# Altium PCB iMX6 Rex_V1I1_PCB.PcbDoc (part 2 of 8)
Units mm, origin at the board's own origin, x right, y up, seen from the top; angles counter-clockwise.
Board outline 70 x 40 mm, 12 copper layers (L1, L2, L3, L4, L5 (PWR), L6 (PWR), L7 (PWR), L8 (PWR), L9, L10, L11, L12), stack 1.566 mm thick; 473 components, 409 nets, 2294 pads, 1880 vias.
Unrouted connection lines stored in the file: 7.
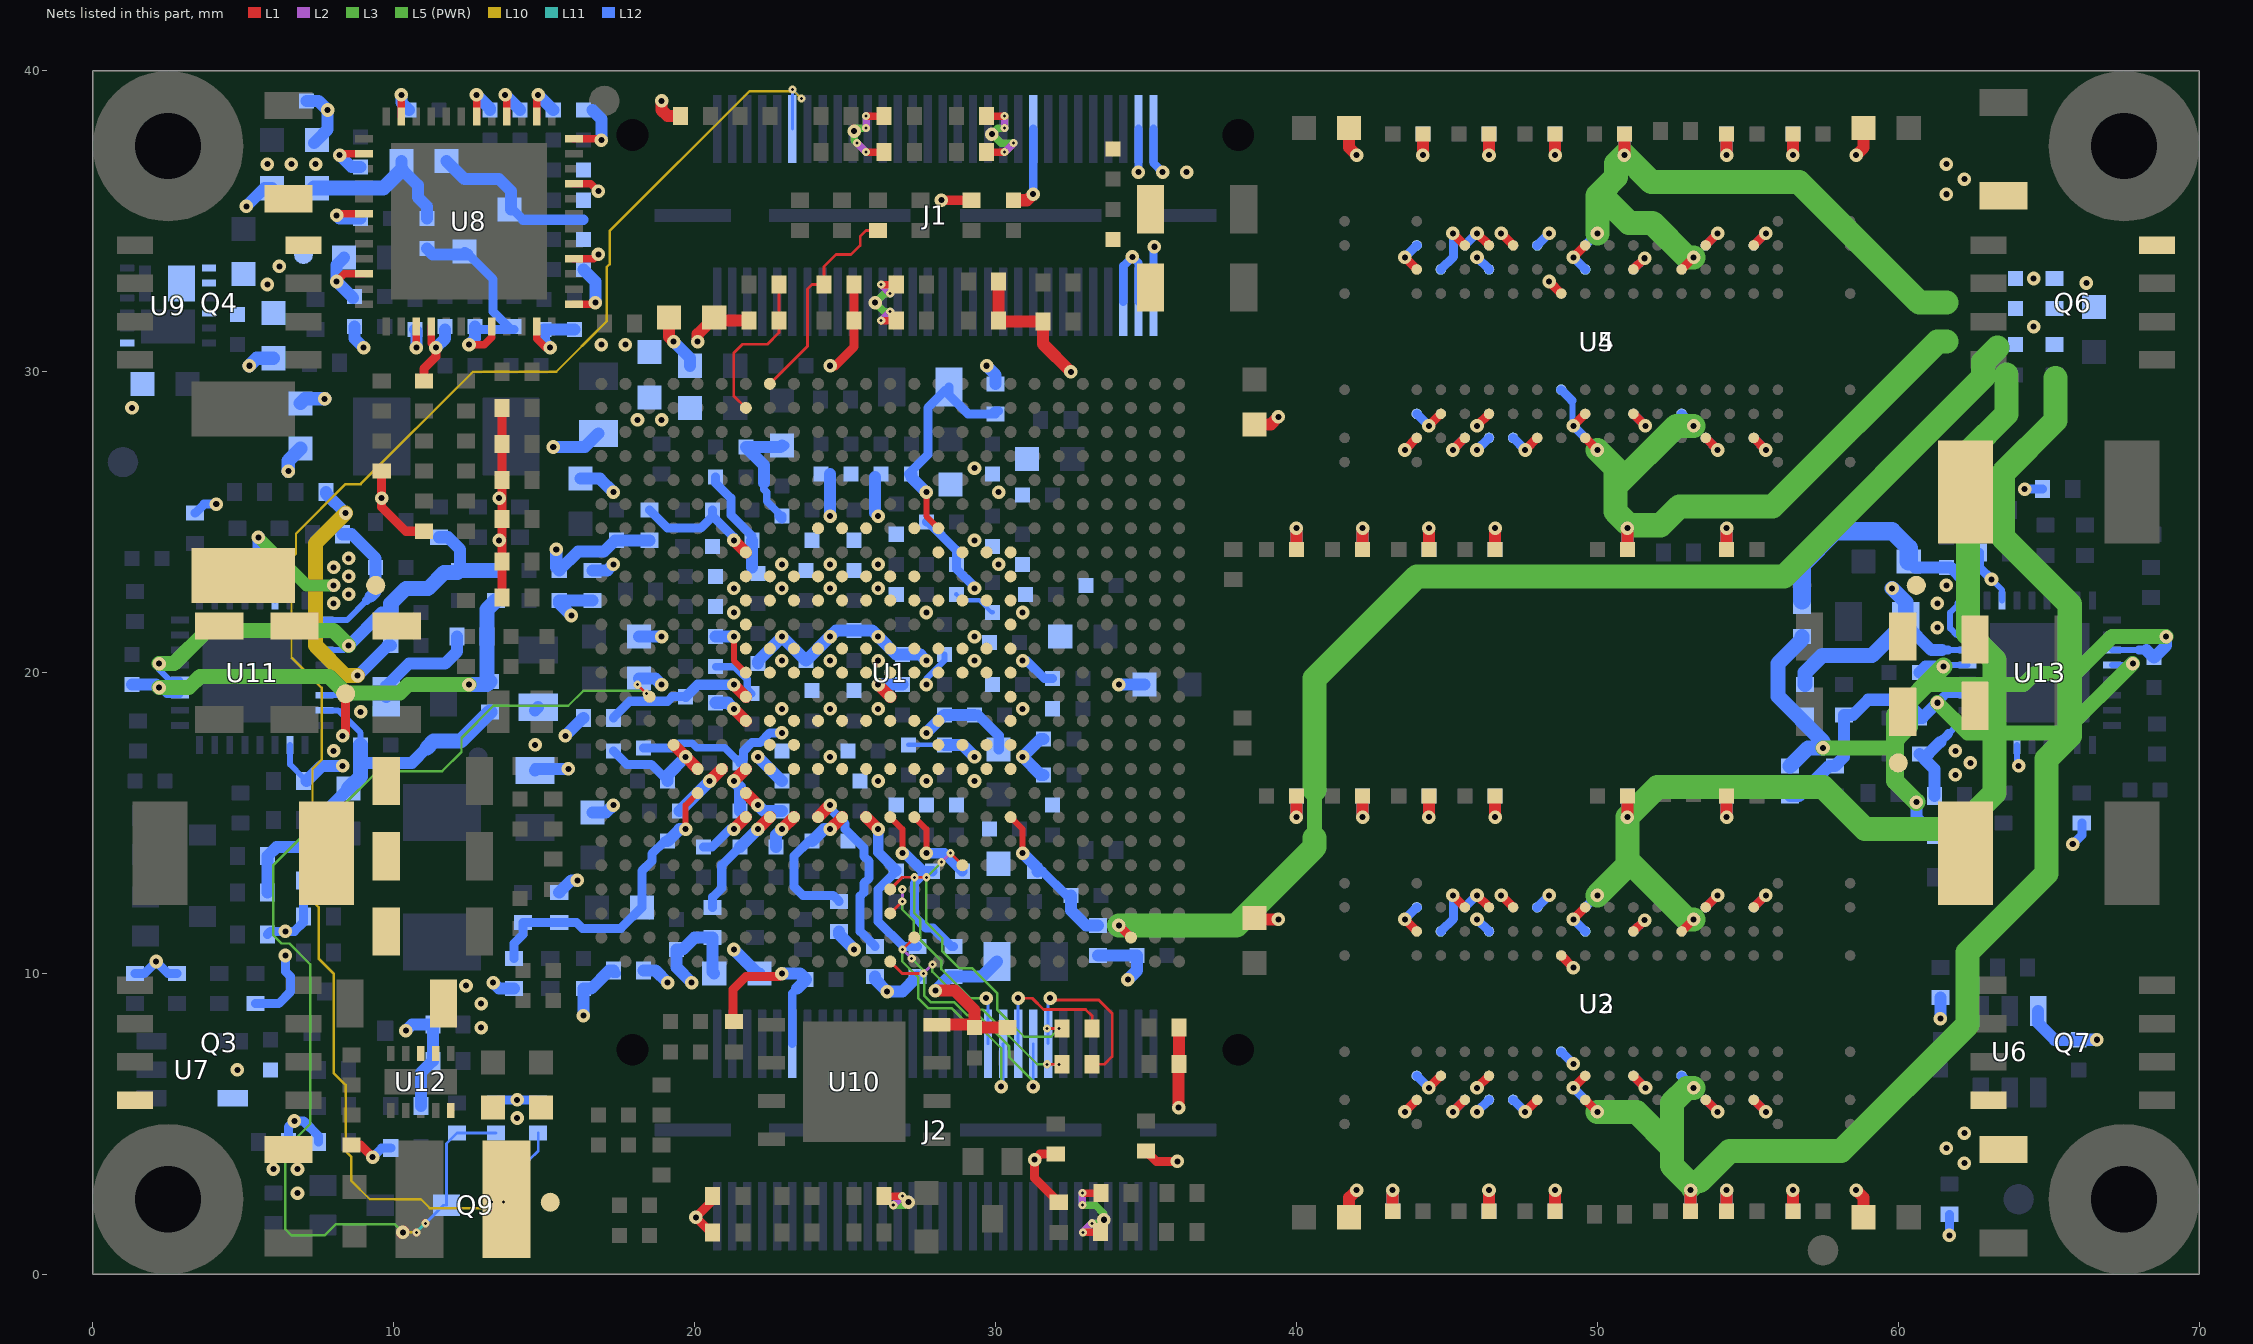
[diagram p12: the nets of this part, all layers, seen from the top]

## Footprints (in the part's own frame and the unit in brackets; to place one, negate y for a bottom-side part, rotate by r counter-clockwise, add the part's x,y. Pads: shape width x height; smd on the part's side, far side on the other; paste and mask are expansions set on the pad) (continued)
PBGA624 [mm] "Creator MM"
  round 0.4 smd mask+0.05: A2(-8.8,9.6) A3(-8,9.6) A4(-7.2,9.6) A5(-6.4,9.6) A6(-5.6,9.6) A7(-4.8,9.6) A8(-4,9.6) A9(-3.2,9.6) A10(-2.4,9.6) A11(-1.6,9.6) A12(-0.8,9.6) A13(0,9.6) A14(0.8,9.6) A15(1.6,9.6) A16(2.4,9.6) A17(3.2,9.6) A18(4,9.6) A19(4.8,9.6) A20(5.6,9.6) A21(6.4,9.6) A22(7.2,9.6) A23(8,9.6) A24(8.8,9.6) A25(9.6,9.6) AA1(-9.6,-6.4) AA2(-8.8,-6.4) AA3(-8,-6.4) AA4(-7.2,-6.4) AA5(-6.4,-6.4) AA6(-5.6,-6.4) AA7(-4.8,-6.4) AA8(-4,-6.4) AA9(-3.2,-6.4) AA10(-2.4,-6.4) AA11(-1.6,-6.4) AA12(-0.8,-6.4) AA13(0,-6.4) AA14(0.8,-6.4) AA15(1.6,-6.4) AA16(2.4,-6.4) AA17(3.2,-6.4) AA18(4,-6.4) AA19(4.8,-6.4) AA20(5.6,-6.4) AA21(6.4,-6.4) AA22(7.2,-6.4) AA23(8,-6.4) AA24(8.8,-6.4) AA25(9.6,-6.4) AB1(-9.6,-7.2) AB2(-8.8,-7.2) AB3(-8,-7.2) AB4(-7.2,-7.2) AB5(-6.4,-7.2) AB6(-5.6,-7.2) AB7(-4.8,-7.2) AB8(-4,-7.2) AB9(-3.2,-7.2) AB10(-2.4,-7.2) AB11(-1.6,-7.2) AB12(-0.8,-7.2) AB13(0,-7.2) AB14(0.8,-7.2) AB15(1.6,-7.2) AB16(2.4,-7.2) AB17(3.2,-7.2) AB18(4,-7.2) AB19(4.8,-7.2) AB20(5.6,-7.2) AB21(6.4,-7.2) AB22(7.2,-7.2) AB23(8,-7.2) AB24(8.8,-7.2) AB25(9.6,-7.2) AC1(-9.6,-8) AC2(-8.8,-8) AC3(-8,-8) AC4(-7.2,-8) AC5(-6.4,-8) AC6(-5.6,-8) AC7(-4.8,-8) AC8(-4,-8) AC9(-3.2,-8) AC10(-2.4,-8) AC11(-1.6,-8) AC12(-0.8,-8) AC13(0,-8) AC14(0.8,-8) AC15(1.6,-8) AC16(2.4,-8) AC17(3.2,-8) AC18(4,-8) AC19(4.8,-8) AC20(5.6,-8) AC21(6.4,-8) AC22(7.2,-8) AC23(8,-8) AC24(8.8,-8) AC25(9.6,-8) AD1(-9.6,-8.8) AD2(-8.8,-8.8) AD3(-8,-8.8) AD4(-7.2,-8.8) AD5(-6.4,-8.8) AD6(-5.6,-8.8) AD7(-4.8,-8.8) AD8(-4,-8.8) AD9(-3.2,-8.8) AD10(-2.4,-8.8) AD11(-1.6,-8.8) AD12(-0.8,-8.8) AD13(0,-8.8) AD14(0.8,-8.8) AD15(1.6,-8.8) AD16(2.4,-8.8) AD17(3.2,-8.8) AD18(4,-8.8) AD19(4.8,-8.8) AD20(5.6,-8.8) AD21(6.4,-8.8) AD22(7.2,-8.8) AD23(8,-8.8) AD24(8.8,-8.8) AD25(9.6,-8.8) AE1(-9.6,-9.6) AE2(-8.8,-9.6) AE3(-8,-9.6) AE4(-7.2,-9.6) AE5(-6.4,-9.6) AE6(-5.6,-9.6) AE7(-4.8,-9.6) AE8(-4,-9.6) AE9(-3.2,-9.6) AE10(-2.4,-9.6) AE11(-1.6,-9.6) AE12(-0.8,-9.6) AE13(0,-9.6) AE14(0.8,-9.6) AE15(1.6,-9.6) AE16(2.4,-9.6) AE17(3.2,-9.6) AE18(4,-9.6) AE19(4.8,-9.6) AE20(5.6,-9.6) AE21(6.4,-9.6) AE22(7.2,-9.6) AE23(8,-9.6) AE24(8.8,-9.6) AE25(9.6,-9.6) B1(-9.6,8.8) B2(-8.8,8.8) B3(-8,8.8) B4(-7.2,8.8) B5(-6.4,8.8) B6(-5.6,8.8) B7(-4.8,8.8) B8(-4,8.8) B9(-3.2,8.8) B10(-2.4,8.8) B11(-1.6,8.8) B12(-0.8,8.8) B13(0,8.8) B14(0.8,8.8) B15(1.6,8.8) B16(2.4,8.8) B17(3.2,8.8) B18(4,8.8) B19(4.8,8.8) B20(5.6,8.8) B21(6.4,8.8) B22(7.2,8.8) B23(8,8.8) B24(8.8,8.8) B25(9.6,8.8) C1(-9.6,8) C2(-8.8,8) C3(-8,8) C4(-7.2,8) C5(-6.4,8) C6(-5.6,8) C7(-4.8,8) C8(-4,8) C9(-3.2,8) C10(-2.4,8) C11(-1.6,8) C12(-0.8,8) C13(0,8) C14(0.8,8) C15(1.6,8) C16(2.4,8) C17(3.2,8) C18(4,8) C19(4.8,8) C20(5.6,8) C21(6.4,8) C22(7.2,8) C23(8,8) C24(8.8,8) C25(9.6,8) D1(-9.6,7.2) D2(-8.8,7.2) D3(-8,7.2) D4(-7.2,7.2) D5(-6.4,7.2) D6(-5.6,7.2) D7(-4.8,7.2) D8(-4,7.2) D9(-3.2,7.2) D10(-2.4,7.2) D11(-1.6,7.2) D12(-0.8,7.2) D13(0,7.2) D14(0.8,7.2) D15(1.6,7.2) D16(2.4,7.2) D17(3.2,7.2) D18(4,7.2) D19(4.8,7.2) D20(5.6,7.2) D21(6.4,7.2) D22(7.2,7.2) D23(8,7.2) D24(8.8,7.2) D25(9.6,7.2) E1(-9.6,6.4) E2(-8.8,6.4) E3(-8,6.4) E4(-7.2,6.4) E5(-6.4,6.4) E6(-5.6,6.4) E7(-4.8,6.4) E8(-4,6.4) E9(-3.2,6.4) E10(-2.4,6.4) E11(-1.6,6.4) E12(-0.8,6.4) E13(0,6.4) E14(0.8,6.4) E15(1.6,6.4) E16(2.4,6.4) E17(3.2,6.4) E18(4,6.4) E19(4.8,6.4) E20(5.6,6.4) E21(6.4,6.4) E22(7.2,6.4) E23(8,6.4) E24(8.8,6.4) E25(9.6,6.4) F1(-9.6,5.6) F2(-8.8,5.6) F3(-8,5.6) F4(-7.2,5.6) F5(-6.4,5.6) F6(-5.6,5.6) F7(-4.8,5.6) F8(-4,5.6) F9(-3.2,5.6) F10(-2.4,5.6) F11(-1.6,5.6) F12(-0.8,5.6) F13(0,5.6) F14(0.8,5.6) F15(1.6,5.6) F16(2.4,5.6) F17(3.2,5.6) F18(4,5.6) F19(4.8,5.6) F20(5.6,5.6) F21(6.4,5.6) F22(7.2,5.6) F23(8,5.6) F24(8.8,5.6) F25(9.6,5.6) G1(-9.6,4.8) G2(-8.8,4.8) G3(-8,4.8) G4(-7.2,4.8) G5(-6.4,4.8) G6(-5.6,4.8) G7(-4.8,4.8) G8(-4,4.8) G9(-3.2,4.8) G10(-2.4,4.8) G11(-1.6,4.8) G12(-0.8,4.8) G13(0,4.8) G14(0.8,4.8) G15(1.6,4.8) G16(2.4,4.8) G17(3.2,4.8) G18(4,4.8) G19(4.8,4.8) G20(5.6,4.8) G21(6.4,4.8) G22(7.2,4.8) G23(8,4.8) G24(8.8,4.8) G25(9.6,4.8) H1(-9.6,4) H2(-8.8,4) H3(-8,4) H4(-7.2,4) H5(-6.4,4) H6(-5.6,4) H7(-4.8,4) H8(-4,4) H9(-3.2,4) H10(-2.4,4) H11(-1.6,4) H12(-0.8,4) H13(0,4) H14(0.8,4) H15(1.6,4) H16(2.4,4) H17(3.2,4) H18(4,4) H19(4.8,4) H20(5.6,4) H21(6.4,4) H22(7.2,4) H23(8,4) H24(8.8,4) H25(9.6,4) J1(-9.6,3.2) J2(-8.8,3.2) J3(-8,3.2) J4(-7.2,3.2) J5(-6.4,3.2) J6(-5.6,3.2) J7(-4.8,3.2) J8(-4,3.2) J9(-3.2,3.2) J10(-2.4,3.2) J11(-1.6,3.2) J12(-0.8,3.2) J13(0,3.2) J14(0.8,3.2) J15(1.6,3.2) J16(2.4,3.2) J17(3.2,3.2) J18(4,3.2) J19(4.8,3.2) J20(5.6,3.2) J21(6.4,3.2) J22(7.2,3.2) J23(8,3.2) J24(8.8,3.2) J25(9.6,3.2) K1(-9.6,2.4) K2(-8.8,2.4) K3(-8,2.4) K4(-7.2,2.4) K5(-6.4,2.4) K6(-5.6,2.4) K7(-4.8,2.4) K8(-4,2.4) K9(-3.2,2.4) K10(-2.4,2.4) K11(-1.6,2.4) K12(-0.8,2.4) K13(0,2.4) K14(0.8,2.4) K15(1.6,2.4) K16(2.4,2.4) K17(3.2,2.4) K18(4,2.4) K19(4.8,2.4) K20(5.6,2.4) K21(6.4,2.4) K22(7.2,2.4) K23(8,2.4) K24(8.8,2.4) K25(9.6,2.4) L1(-9.6,1.6) L2(-8.8,1.6) L3(-8,1.6) L4(-7.2,1.6) L5(-6.4,1.6) L6(-5.6,1.6) L7(-4.8,1.6) L8(-4,1.6) L9(-3.2,1.6) L10(-2.4,1.6) L11(-1.6,1.6) L12(-0.8,1.6) L13(0,1.6) L14(0.8,1.6) L15(1.6,1.6) L16(2.4,1.6) L17(3.2,1.6) L18(4,1.6) L19(4.8,1.6) L20(5.6,1.6) L21(6.4,1.6) L22(7.2,1.6) L23(8,1.6) L24(8.8,1.6) L25(9.6,1.6) M1(-9.6,0.8) M2(-8.8,0.8) M3(-8,0.8) M4(-7.2,0.8) M5(-6.4,0.8) M6(-5.6,0.8) M7(-4.8,0.8) M8(-4,0.8) M9(-3.2,0.8) M10(-2.4,0.8) M11(-1.6,0.8) M12(-0.8,0.8) M13(0,0.8) M14(0.8,0.8) M15(1.6,0.8) M16(2.4,0.8) M17(3.2,0.8) M18(4,0.8) M19(4.8,0.8) M20(5.6,0.8) M21(6.4,0.8) M22(7.2,0.8) M23(8,0.8) M24(8.8,0.8) M25(9.6,0.8) N1(-9.6,0) N2(-8.8,0) N3(-8,0) N4(-7.2,0) N5(-6.4,0) N6(-5.6,0) N7(-4.8,0) N8(-4,0) N9(-3.2,0) N10(-2.4,0) N11(-1.6,0) N12(-0.8,0) N13(0,0) N14(0.8,0) N15(1.6,0) N16(2.4,0) N17(3.2,0) N18(4,0) N19(4.8,0) N20(5.6,0) N21(6.4,0) N22(7.2,0) N23(8,0) N24(8.8,0) N25(9.6,0) P1(-9.6,-0.8) P2(-8.8,-0.8) P3(-8,-0.8) P4(-7.2,-0.8) P5(-6.4,-0.8) P6(-5.6,-0.8) P7(-4.8,-0.8) P8(-4,-0.8) P9(-3.2,-0.8) P10(-2.4,-0.8) P11(-1.6,-0.8) P12(-0.8,-0.8) P13(0,-0.8) P14(0.8,-0.8) P15(1.6,-0.8) P16(2.4,-0.8) P17(3.2,-0.8) P18(4,-0.8) P19(4.8,-0.8) P20(5.6,-0.8) P21(6.4,-0.8) P22(7.2,-0.8) P23(8,-0.8) P24(8.8,-0.8) P25(9.6,-0.8) R1(-9.6,-1.6) R2(-8.8,-1.6) R3(-8,-1.6) R4(-7.2,-1.6) R5(-6.4,-1.6) R6(-5.6,-1.6) R7(-4.8,-1.6) R8(-4,-1.6) R9(-3.2,-1.6) R10(-2.4,-1.6) R11(-1.6,-1.6) R12(-0.8,-1.6) R13(0,-1.6) R14(0.8,-1.6) R15(1.6,-1.6) R16(2.4,-1.6) R17(3.2,-1.6) R18(4,-1.6) R19(4.8,-1.6) R20(5.6,-1.6) R21(6.4,-1.6) R22(7.2,-1.6) R23(8,-1.6) R24(8.8,-1.6) R25(9.6,-1.6) T1(-9.6,-2.4) T2(-8.8,-2.4) T3(-8,-2.4) T4(-7.2,-2.4) T5(-6.4,-2.4) T6(-5.6,-2.4) T7(-4.8,-2.4) T8(-4,-2.4) T9(-3.2,-2.4) T10(-2.4,-2.4) T11(-1.6,-2.4) T12(-0.8,-2.4) T13(0,-2.4) T14(0.8,-2.4) T15(1.6,-2.4) T16(2.4,-2.4) T17(3.2,-2.4) T18(4,-2.4) T19(4.8,-2.4) T20(5.6,-2.4) T21(6.4,-2.4) T22(7.2,-2.4) T23(8,-2.4) T24(8.8,-2.4) T25(9.6,-2.4) U1(-9.6,-3.2) U2(-8.8,-3.2) U3(-8,-3.2) U4(-7.2,-3.2) U5(-6.4,-3.2) U6(-5.6,-3.2) U7(-4.8,-3.2) U8(-4,-3.2) U9(-3.2,-3.2) U10(-2.4,-3.2) U11(-1.6,-3.2) U12(-0.8,-3.2) U13(0,-3.2) U14(0.8,-3.2) U15(1.6,-3.2) U16(2.4,-3.2) U17(3.2,-3.2) U18(4,-3.2) U19(4.8,-3.2) U20(5.6,-3.2) U21(6.4,-3.2) U22(7.2,-3.2) U23(8,-3.2) U24(8.8,-3.2) U25(9.6,-3.2) V1(-9.6,-4) V2(-8.8,-4) V3(-8,-4) V4(-7.2,-4) V5(-6.4,-4) V6(-5.6,-4) V7(-4.8,-4) V8(-4,-4) V9(-3.2,-4) V10(-2.4,-4) V11(-1.6,-4) V12(-0.8,-4) V13(0,-4) V14(0.8,-4) V15(1.6,-4) V16(2.4,-4) V17(3.2,-4) V18(4,-4) V19(4.8,-4) V20(5.6,-4) V21(6.4,-4) V22(7.2,-4) V23(8,-4) V24(8.8,-4) V25(9.6,-4) W1(-9.6,-4.8) W2(-8.8,-4.8) W3(-8,-4.8) W4(-7.2,-4.8) W5(-6.4,-4.8) W6(-5.6,-4.8) W7(-4.8,-4.8) W8(-4,-4.8) W9(-3.2,-4.8) W10(-2.4,-4.8) W11(-1.6,-4.8) W12(-0.8,-4.8) W13(0,-4.8) W14(0.8,-4.8) W15(1.6,-4.8) W16(2.4,-4.8) W17(3.2,-4.8) W18(4,-4.8) W19(4.8,-4.8) W20(5.6,-4.8) W21(6.4,-4.8) W22(7.2,-4.8) W23(8,-4.8) W24(8.8,-4.8) W25(9.6,-4.8) Y1(-9.6,-5.6) Y2(-8.8,-5.6) Y3(-8,-5.6) Y4(-7.2,-5.6) Y5(-6.4,-5.6) Y6(-5.6,-5.6) Y7(-4.8,-5.6) Y8(-4,-5.6) Y9(-3.2,-5.6) Y10(-2.4,-5.6) Y11(-1.6,-5.6) Y12(-0.8,-5.6) Y13(0,-5.6) Y14(0.8,-5.6) Y15(1.6,-5.6) Y16(2.4,-5.6) Y17(3.2,-5.6) Y18(4,-5.6) Y19(4.8,-5.6) Y20(5.6,-5.6) Y21(6.4,-5.6) Y22(7.2,-5.6) Y23(8,-5.6) Y24(8.8,-5.6) Y25(9.6,-5.6)
  silkscreen extent -10.6,-10.6 10.6,10.6, body extent -10.5,-10.5 10.5,10.5, height 1.1
QFN48_7MMX7MM [mm] "Creator MM"
  rect 0.6x0.25 smd mask+0.03: 1(-3.49,2.75) 2(-3.49,2.25) 3(-3.49,1.75) 4(-3.49,1.25) 5(-3.49,0.75) 6(-3.49,0.25) 7(-3.49,-0.25) 8(-3.49,-0.75) 9(-3.49,-1.25) 10(-3.49,-1.75) 11(-3.49,-2.25) 12(-3.49,-2.75) 25(3.49,-2.75) 26(3.49,-2.25) 27(3.49,-1.75) 28(3.49,-1.25) 29(3.49,-0.75) 30(3.49,-0.25) 31(3.49,0.25) 32(3.49,0.75) 33(3.49,1.25) 34(3.49,1.75) 35(3.49,2.25) 36(3.49,2.75)
  rect 0.25x0.6 smd mask+0.03: 13(-2.75,-3.49) 14(-2.25,-3.49) 15(-1.75,-3.49) 16(-1.25,-3.49) 17(-0.75,-3.49) 18(-0.25,-3.49) 19(0.25,-3.49) 20(0.75,-3.49) 21(1.25,-3.49) 22(1.75,-3.49) 23(2.25,-3.49) 24(2.75,-3.49) 37(2.75,3.49) 38(2.25,3.49) 39(1.75,3.49) 40(1.25,3.49) 41(0.75,3.49) 42(0.25,3.49) 43(-0.25,3.49) 44(-0.75,3.49) 45(-1.25,3.49) 46(-1.75,3.49) 47(-2.25,3.49) 48(-2.75,3.49)
  rect 5.2x5.2 smd paste-10 mask+0.025: 49(0,0)
  silkscreen extent -3.5,-3.5 3.5,3.5, body extent -3.51,-3.51 3.51,3.51, height 0.78
QSH-030-01-L-D-A [mm]
  rect 2.27x0.28 smd mask+0.051: 1(-2.87,7.25) 2(2.87,7.25) 3(-2.87,6.75) 4(2.87,6.75) 5(-2.87,6.25) 6(2.87,6.25) 7(-2.87,5.75) 8(2.87,5.75) 9(-2.87,5.25) 10(2.87,5.25) 11(-2.87,4.75) 12(2.87,4.75) 13(-2.87,4.25) 14(2.87,4.25) 15(-2.87,3.75) 16(2.87,3.75) 17(-2.87,3.25) 18(2.87,3.25) 19(-2.87,2.75) 20(2.87,2.75) 21(-2.87,2.25) 22(2.87,2.25) 23(-2.87,1.75) 24(2.87,1.75) 25(-2.87,1.25) 26(2.87,1.25) 27(-2.87,0.75) 28(2.87,0.75) 29(-2.87,0.25) 30(2.87,0.25) 31(-2.87,-0.25) 32(2.87,-0.25) 33(-2.87,-0.75) 34(2.87,-0.75) 35(-2.87,-1.25) 36(2.87,-1.25) 37(-2.87,-1.75) 38(2.87,-1.75) 39(-2.87,-2.25) 40(2.87,-2.25) 41(-2.87,-2.75) 42(2.87,-2.75) 43(-2.87,-3.25) 44(2.87,-3.25) 45(-2.87,-3.75) 46(2.87,-3.75) 47(-2.87,-4.25) 48(2.87,-4.25) 49(-2.87,-4.75) 50(2.87,-4.75) 51(-2.87,-5.25) 52(2.87,-5.25) 53(-2.87,-5.75) 54(2.87,-5.75) 55(-2.87,-6.25) 56(2.87,-6.25) 57(-2.87,-6.75) 58(2.87,-6.75) 59(-2.87,-7.25) 60(2.87,-7.25)
  rect 0.43x2.54 smd mask+0.076: 61(0,8.065) 64(0,-8.065)
  rect 0.43x4.7 smd mask+0.076: 62(0,3.175) 63(0,-3.175)
  round 0 hole 1.05 unplated: 65(2.67,10.065) 66(2.67,-10.065)
  silkscreen extent -3.68,-10.8 3.68,10.8, body extent -3.75,-10.64 3.75,10.64, height 3.42
R0402 [mm]
  rect 0.5x0.6 smd: 1(-0.5,0) 2(0.5,0)
  silkscreen extent -1,-0.6 1,0.6, body extent -0.5,-0.25 0.5,0.25, height 0.4
SC70_SOT323 [mm]
  rect 0.9x0.7 smd: 1(-0.95,0.65) 2(-0.95,-0.65) 3(0.95,0)
  silkscreen extent -0.7,-1.27 0.7,1.27, body extent -1.27,-1.27 1.27,1.27, height 1.1
SOD323 [mil]
  rect 22x27 smd mask+3: 1(-48,0) 2(48,0)
  silkscreen extent -75,-28 71,28, body extent -49,-25 49,25, height 39
TP_25C [mm]
  round 0.635 smd paste-0.635 mask+0.051: 1(0,0)
VLCF4020 [mm] "Creator MM"
  rect 1.6x3.9 smd paste-10: 1(-1.45,0)
  rect 1.6x3.9 smd paste-10 mask+0.1: 2(1.45,0)
  silkscreen extent -0.35,-2.1 0.35,2.1, body extent -2.15,-2 2.15,2, height 2.1
WSON8_6X5MM [mm] "Creator MM"
  rect 0.9x0.45 smd: 1(-2.75,1.905) 2(-2.75,0.635) 3(-2.75,-0.635) 4(-2.75,-1.905) 5(2.75,-1.905) 6(2.75,-0.635) 7(2.75,0.635) 8(2.75,1.905)
  rect 3.4x4 smd: 9(0,0)
  silkscreen extent -3.1,-2.6 3.1,2.8, body extent -3,-2.5 3,2.5, height 0.8

## Part data
C1 C206 C207 C225 C226: library part C1005X5R1C105K, "CAP CER 1.0UF 16V X5R 0402"
C2 C209 C210 C220 C228 C229 C241: library part GRM31CR6YA106KA12L, "CAP CER 10UF 35V X5R 1206"
C3 C4 C5 C6 C8 C9 C10 C11 C21 C22 C23 C24 C25 C26 C27 C28 C29 C30 C31 C32 C33 C34 C35 C36 C37 C38 C39 C40 C41 C42 C43 C44 C45 C46 C47 C48 C49 C50 C51 C52 C53 C54 C55 C56 C57 C58 C59 C60 C61 C62 C64 C68 C73 C75 C76 C77 C79 C81 C82 C90 C91 C92 C93 C94 C95 C97 C98 C99 C100 C102 C103 C104 C105 C107 C108 C109 C110 C112 C113 C114 C115 C116 C117 C119 C120 C121 C122 C123 C124 C125 C126 C130 C131 C132 C133 C134 C136 C138 C140 C142 C143 C144 C145 C146 C149 C150 C152 C153 C154 C155 C157 C158 C159 C160 C161 C162 C163 C164 C165 C166 C167 C168 C169 C170 C171 C174: library part C1005X5R1E224M, "CAP CER .22UF 25V X5R 20% 0402"
C7 C18 C20 C63 C65 C66 C67 C74 C87 C88 C89 C181 C187 C190 C192 C195 C203 C205 C211 C212 C219 C224 C230 C231 C238 C239 C240 C242: library part C1005X5R1H104K, "CAP CER .10UF 50V X5R 10% 0402"
C12 C13 C14 C15 C16 C17 C96 C101 C106 C111 C118 C127 C128 C129 C135 C151 C172 C173: library part GRM188R60G226MEA0L, "CAP CER 22UF 4V 20% X5R 0603"
C19 C80 C177 C178 C180 C186 C191 C194 C199 C204 C221 C222 C223: library part C1608X5R0J106M, "CAP CER 10UF 6.3V X5R 20% 0603"
C69 C70 C71 C72 C139: library part C1005X7R1H103K, "CAP CER 10000PF 50V 10% X7R 0402"
C78 C243 C244 C245 C246 C247: library part C1005X5R1A475M, "CAP CER 4.7UF 10V 20% X5R 0402"
C83 C84 C85 C86: library part C1005C0G1H180J, "CAP CER 18PF 50V C0G 5% 0402"
C137 C141 C147 C148 C156: library part C2012X5R1C226K, "CAP CER 22UF 16V 10% X5R 0805"
C175 C176: library part C1005C0G1H220J, "CAP CER 22PF 50V C0G 5% 0402"
C179: library part GRM1555C1H561JA01D, "CAP CER 560PF 50V C0G 0402"
C182 C183 C184 C185 C188 C189 C193 C196 C197 C198 C200 C201 C202 C218 C237 C248 C249: library part C1005X7R1C103K, "CAP CER 10000PF 16V X7R 10% 0402"
C208 C227: library part GRM21BR71H105KA12L, "CAP CER 1UF 50V X7R 0805"
C213 C214 C215 C216 C217 C232 C233 C234 C235 C236: library part C3216X5R1A107M, "CAP CER 100UF 10V X5R 20% 1206"
D1: "DIODE SCHTKY 30MA 30V SOD-323"
D2: library part "LG L29K-G2J1-24-Z", "LED SMARTLED GREEN 570NM 0603"
D3: library part "LO L29K-H2K1-24-Z", "LED SMARTLED ORANGE 606NM 0603"
FB1 FB2 FB8: library part BLM18SG221TN1D, "FERRITE CHIP 220 OHM 2500MA 0603"
FB3 FB4 FB6 FB7: "FERRITE CHIP 100 OHM BEAD 0603 3A"
FB5: "FERRITE CHIP 600 OHM 0402 420mA"
FID1 FID2 FID3 FID4: "Fiducial 40mil Diameter, 52mil Mask"
J1 J2: "CONN RCPT HI-SPD .5MM 60POS DL"
L1: library part IHLP2525CZER4R7M01, "INDUCTOR POWER 4.7UH 5.5A SMD"
L2 L4 L5: library part IHLP2525CZER3R3M01, "INDUCTOR POWER 3.3UH 6A SMD"
L3: "INDUCTOR POWER 10UH .85A SMD"
MH1 MH2 MH3 MH4: "Mounting Hole 5mm Diameter, 2.2mm Drill"
Q1 Q2 Q5 Q8 Q9: "MOSFET N-CH 60V 310MA SOT323"
Q3 Q4 Q6 Q7: "MOSFET DL N-CH 30V 6.8A 8-SOIC"
R1 R35 R36 R50 R52 R66 R72 R83 R85 R86 R90 R92 R112 R159 R160 R161: library part RC0402FR-0722RL, "RES 22.0 OHM 1/16W 1% 0402 SMD"
R2 R3 R15: library part CRCW0402200RFKED, "RES 200 OHM 1/16W 1% 0402 SMD"
R4 R5 R8 R9 R10 R11 R12: library part RMCF0402FT240R, "RES TF 240 OHM 1% 0.0625W 0402"
R6 R7 R33 R38 R39 R40 R41 R42 R43 R48 R49 R57 R58 R60 R62 R63 R64 R67 R68 R69 R75 R91 R94 R95 R96 R97 R98 R100 R103 R104 R109 R110 R115 R127 R129 R130 R131 R132 R133 R136 R151 R153 R154 R155 R158 R165: library part RC0402FR-0710KL, "RES 10.0K OHM 1/16W 1% 0402 SMD"
R13 R14 R18 R19 R23 R24 R25 R26 R27 R34 R51 R65 R70 R71 R74 R76 R78 R80 R88 R93 R105 R106 R107 R108 R116 R117 R128 R140 R141 R152 R156 R157 R163 R164: library part RC0402JR-070RL, "RES 0.0 OHM 1/16W 0402 SMD"
R16 R17: library part RC0402FR-0749R9L, "RES 49.9 OHM 1/16W 1% 0402 SMD"
R20: library part CRCW0402191RFKED, "RES 191 OHM 1/16W 1% 0402 SMD"
R21 R22: library part RC0402FR-0747KL, "RES 47.0K OHM 1/16W 1% 0402 SMD"
R28 R29 R31 R32 R44 R45 R46 R47 R55 R56 R59 R84 R87 R89 R120: library part RMCF0402FT4K99, "RES TF 4.99K OHM 1% 1/16W 0402"
R30: library part ERJ-2RKF1601X, "RES 1.6K OHM 1/10W 1% 0402 SMD"
R37: library part CRCW04022M20FKED, "RES 2.20M OHM 1/16W 1% 0402 SMD"
R53 R54: library part CRCW040210M0FKED, "RES 10.0M OHM 1/16W 1% 0402 SMD"
R61 R99 R101 R102 R162: library part RC0402FR-071KL, "RES 1.00K OHM 1/16W 1% 0402 SMD"
R73 R111 R137 R143 R144: library part RMCF0402FT100K, "RES 100K OHM 1/16W 1% 0402 SMD"
R77: library part CRCW04022R20FKED, "RES 2.20 OHM 1/16W 1% 0402 SMD"
R79 R118 R142: library part RC0402FR-0710RL, "RES 10.0 OHM 1/16W 1% 0402 SMD"
R81 R82 R113 R114: library part RC0402FR-07220RL, "RES 220 OHM 1/16W 1% 0402 SMD"
R119: library part RC0402FR-0714KL, "RES 14.0K OHM 1/16W 1% 0402 SMD"
R121 R122 R145 R146: library part RC0402FR-071RL, "RES 1.00 OHM 1/16W 1% 0402 SM"
R123: library part RC0402FR-0739KL, "RES 39.0K OHM 1/16W 1% 0402 SMD"
R124 R125 R148 R149: library part RC0402FR-07200KL, "RES 200K OHM 1/16W 1% 0402 SMD"
R126 R150: library part CRCW040210K5FKED, "RES 10.5K OHM 1/16W 1% 0402 SMD"
R134: library part RC0402FR-0712KL, "RES 12.0K OHM 1/16W 1% 0402 SMD"
R135: library part RC0402FR-073K3L, "RES 3.30K OHM 1/16W 1% 0402 SMD"
R138: library part CRCW0402330KFKED, "RES 330K OHM 1/16W 1% 0402 SMD"
R139: library part RC0402FR-07120KL, "RES 120K OHM 1/16W 1% 0402 SMD"
R147: library part RC0402FR-0727KL, "RES 27.0K OHM 1/16W 1% 0402 SMD"
TP3 TP5 TP6 TP7 TP8 TP9 TP10 TP11: "Test Point 25mil"
U1: "IC MCU 32BIT ARM QUAD 624FCBGA"
U2 U3 U4 U5: "IC DDR3 SDRAM 2GBIT 667MHZ 96BGA"
U6: library part TPS3808G09DBVR, "IC VOLT SUPERVISOR 0.9V SOT23-6"
U7: "IC GATE AND SGL 2INP SOT23-5"
U8: "IC TXRX 10/100/1000 SGL 48QFN"
U9: "IC PWM REG 600mA 1.2V 12-MLF"
U10: library part SST25VF016B-75-4I-QAF, "IC FLASH 16MBIT 75MHZ 8WSON"
U11 U13: "IC MAIN PWR CTRLR QUAD 32-QFN"
U12: "IC REG BUCK SYNC ADJ 0.5A 10WSON"
Y1: library part ABM7-24.000MHZ-D-2-Y-T, "CRYSTAL 24.0000MHZ 18PF SMD"
Y2: library part ABS06-32.768KHZ-9-1-T, "CRYSTAL 32.768 KHZ 9.0 PF SMD"
Y3: library part "ABM7-25.000MHZ-D-2-Y-T V1.1", "CRYSTAL 25.0000 MHZ 18PF SMD"

## Via types
v1: diameter 0.45, hole 0.2, L1 to L12, tented both sides, 761 vias
v2: diameter 0.27, hole 0.1, L1 to L2, 305 vias
v3: diameter 0.27, hole 0.1, L2 to L3, 290 vias
v4: diameter 0.45, hole 0.2, L3 to L10, 196 vias
v5: diameter 0.27, hole 0.1, L11 to L12, 185 vias
v6: diameter 0.27, hole 0.1, L10 to L11, 142 vias
v7: diameter 0.45, hole 0.2, L3 to L10, tented both sides, 1 vias

## Nets (pads, with @x,y where several pads share a name; then routed paths per layer and width w, separated by ;. In a path a pad name is that pad's centre, name@x,y a point inside that pad or via, vN(x,y) a via of type N, cw(c..) or ccw(c..) an arc to the next point about the centre after c; other vN are vias at no path point)
+1V1_NVCC_PLL_OUT: C150.1 C151.1 R77.2 R79.2 R105.1 U1.E8 | length 10.4
  L1 w0.2: v1(19.7,14.8) 19.7,15.6 U1.E8@20.1,16
  L12 w0.3: R77.2@14,10.5 14,11 14.3,11.3 R79.2@14.3,11.7 R105.1@15.5,11.7 16.072,11.7 16.272,11.5 17.55,11.5 C151.1@18.25,12.2 18.25,13.412 18.575,13.737 18.575,13.975 C150.1@19,14.4 ; C150.1@19.05,14.35 C150.1@19.1,14.4
  L12 w0.4: C150.1@19.1,14.4 19.5,14.8 v1(19.7,14.8)
+1V1_VDDSOC_CAP: C78.1 C112.1 C113.1 C114.1 C115.1 C116.1 C117.1 C118.1 C138.1 C246.1 FB1.1 R13.1 R18.1 R23.1 U1.N12 U1.R10 U1.T10 U1.T13 U1.T14 U1.U10 U1.U13 U1.U14 | length 11.6
  L1 w0.4: v1(26.1,19.6) U1.N12@26.5,19.2
  L12 w0.15: C116.1@27.1,17.6 C115.1@28.3,17.6 ; C113.1@28.7,22.6 28.9,22.4 29.466,22.4 29.866,22 C114.1@29.9,22
  L12 w0.4: v1(15.9,21.9) 15.5,22.3 C246.1@15.5,22.4 R18.1@16.6,22.4 ; v1(19.9,9.7) 19.4,10.2 C78.1@19.4,10.8 19.6,10.8 20,11.2 R13.1@20.6,11.2 20.6,10.05 FB1.1@20.65,10 ; R23.1@24.8,11.4 24.8,11.3 v1(25.3,10.8) ; v1(26.1,19.6) C138.1@26.9,19.6 ; C115.1@28.3,17.6 28.9,17.6 v1(29.3,17.2)
  other v1: 29.3,20.4 29.3,21.2
+1V2_ETH: C178.1 C179.1 FB3.1 FB4.1 FB5.1 FB8.1 R105.2 TP5.1 U9.7 U9.8 U9.10 U9.15 | length 6.2
  L12 w0.4: FB4.1@10.25,37 10.25,36.75 10.8,36.2 10.8,35.8 11.1,35.5 FB5.1@11.1,35.1 ; R105.2@15.5,12.7 15.9,13.1 v1(16.1,13.1)
  L12 w0.5: FB3.1@7.35,36.1 9.65,36.1 FB4.1@10.25,36.7
  other v1: 5.8,32.9 6.2,33.5
+1V2_ETH_AVDDL: C186.1 C187.1 C188.1 C189.1 FB4.2 U8.4 U8.9 | length 7.5
  L1 w0.25: U8.4@15.99,33.75 16.65,33.75 v1(16.8,33.9) ; U8.9@15.99,36.25 16.55,36.25 v1(16.8,36)
  L12 w0.3: C186.1@13.85,35.4 13.9,35.4 13.95,35.4 14.3,35.05
  L12 w0.35: 14.3,35.05 16.3,35.05
  L12 w0.4: FB4.2@11.75,37 12.35,36.4 13.5,36.4 13.9,36 C186.1@13.9,35.4
+1V2_ETH_AVDDL_PLL: C191.1 C192.1 C193.1 FB5.2 U8.44 | length 7.5
  L1 w0.25: v1(12.5,30.9) 13,30.9 13.25,31.15
  L12 w0.3: C191.1@12.35,34 12.372,34 13.3,33.072 13.3,32 C192.1@13.9,31.4 ; C193.1@12.7,31.4 C192.1@13.9,31.4 ; C192.1@14,31.4 C192.1@13.9,31.4
  L12 w0.4: FB5.2@11.1,34.1 11.3,33.9 C191.1@12.45,33.9 ; v1(12.5,30.9) 12.7,31.1 12.7,31.4 C193.1@12.7,31.5
+1V2_ETH_DVDDL: C180.1 C181.1 C182.1 C183.1 C184.1 C185.1 C248.1 C249.1 FB3.2 U8.14 U8.18 U8.23 U8.26 U8.30 U8.39 | length 11.8
  L1 w0.25: v1@8.1,35.1 8.25,35.25 U8.30@9.01,35.25 ; v1@8.2,37.25 8.7,37.25 ; U8.23@10.25,38.49 v1(10.25,39.2) ; v1(10.75,30.8) U8.39@10.75,31.51 ; U8.18@12.75,38.49 v1(12.75,39.2) ; U8.14@14.75,38.49 v1@14.75,39.15
  L12 w0.4: v1(5.1,35.5) 5.7,36.1 FB3.2@5.95,36.1 ; C181.1@7.1,39 7.5,39 v1(7.8,38.7) 7.8,38.05 C180.1@7.45,37.7 C180.1@7.35,37.6 ; v1(8.1,35.2) 8.2,35.1 C183.1@8.9,35.1 ; v1(8.2,37.2) 8.6,36.8 C184.1@8.9,36.8 ; v1(10.25,39.2) 10.25,38.95 C249.1@10.5,38.7 ; C182.1@10.7,31.4 10.75,31.35 v1(10.75,30.8) ; v1(12.75,39.2) 13.2,38.75 C248.1@13.2,38.7 ; v1(14.8,39.2) C185.1@15.3,38.7
+1V2_VDD_ARM_CAP: C97.1 C98.1 C99.1 C100.1 C101.1 C102.1 C103.1 C104.1 C105.1 C106.1 U1.H11 U1.H13 U1.J11 U1.J13 U1.K11 U1.K13 U1.L11 U1.L13 U1.M11 U1.M13 U1.N11 U1.N13 U1.P11 U1.P13 U1.R11 U1.R13 | length 7.2
  L12 w0.2: v1(27.7,19.6) 27.7,19.799 28.3,20.399 C97.1@28.3,20.6
  L12 w0.25: C98.1@20.7,20.2 21.336,20.2 21.75,19.786 21.75,19.45 C103.1@21.9,19.3
  L12 w0.35: C102.1@29.3,18.6 29.407,18.6 30.1,17.907 C106.1@30.1,17.45
  L12 w0.4: C101.1@18.15,19.8 18.7,19.8 v1(18.9,19.6) ; v1(27.7,18) C105.1@28.3,18.6 C102.1@29.3,18.6
  other v1: 22.9,18.8 24.5,18.8 26.1,18.8 22.9,20.4 24.5,20.4 26.1,20.4
+1V5_DDR: C12.1 C13.1 C14.1 C15.1 C16.1 C17.1 C18.1 C19.1 C21.1 C22.1 C23.1 C24.1 C25.1 C26.1 C27.1 C28.1 C29.1 C30.1 C31.1 C32.1 C33.1 C34.1 C35.1 C36.1 C37.1 C38.1 C39.1 C40.1 C41.1 C42.1 C43.1 C44.1 C45.1 C46.1 C47.1 C48.1 C49.1 C50.1 C51.1 C52.1 C53.1 C54.1 C55.1 C56.1 C57.1 C58.1 C59.1 C60.1 C157.1 C158.1 C159.1 C160.1 C161.1 C162.1 C167.1 C168.1 C169.1 C170.1 C171.1 C172.1 C173.1 C235.1 C236.1 L5.2 R11.2 R59.2 TP9.1 U1.R18 U1.T18 U1.U18 U1.V9 U1.V10 U1.V11 U1.V12 U1.V13 U1.V14 U1.V15 U1.V16 U1.V17 U1.V18 U2.A1 U2.A8 U2.B2 U2.C1 U2.C9 U2.D2 U2.D9 U2.E9 U2.F1 U2.G7 U2.H2 U2.H9 U2.K2 U2.K8 U2.N1 U2.N9 U2.R1 U2.R9 U3.A1 U3.A8 U3.B2 U3.C1 U3.C9 U3.D2 U3.D9 U3.E9 U3.F1 U3.G7 U3.H2 U3.H9 U3.K2 U3.K8 U3.N1 U3.N9 U3.R1 U3.R9 U4.A1 U4.A8 U4.B2 U4.C1 U4.C9 U4.D2 U4.D9 U4.E9 U4.F1 U4.G7 U4.H2 U4.H9 U4.K2 U4.K8 U4.N1 U4.N9 U4.R1 U4.R9 U5.A1 U5.A8 U5.B2 U5.C1 U5.C9 U5.D2 U5.D9 U5.E9 U5.F1 U5.G7 U5.H2 U5.H9 U5.K2 U5.K8 U5.N1 U5.N9 U5.R1 U5.R9 U13.30 | length 83
  L1 w0.3: v1(43.6,5.4) U2.A1@44,5.8 ; v1(43.6,11.8) U2.A8@44,11.4 ; v1(43.6,33.8) U4.A8@44,33.4 ; v1@43.625,27.425 U4.A1@44,27.8 ; v1(44.4,6.2) U2.B2@44.8,6.6 ; v1(44.4,28.2) U4.B2@44.8,28.6 ; v1(45.2,5.4) U2.C1@45.6,5.8 ; v1(45.2,12.6) U2.C9@45.6,12.2 ; v1(45.2,27.4) U4.C1@45.6,27.8 ; v1(45.2,34.6) U4.C9@45.6,34.2 ; v1(46,6.2) U2.D2@46.4,6.6 ; v1(46,12.6) U2.D9@46.4,12.2 ; v1(46,28.2) U4.D2@46.4,28.6 ; v1(46,34.6) U4.D9@46.4,34.2 ; v1(46.8,12.6) U2.E9@47.2,12.2 ; v1(46.8,34.6) U4.E9@47.2,34.2 ; v1(47.6,5.4) U2.F1@48,5.8 ; v1(47.6,27.4) U4.F1@48,27.8 ; v1(48.4,33) U4.G7@48.8,32.6 ; U2.G7@48.8,10.6 v1(49.2,10.2) ; v1(49.2,6.2) U2.H2@49.6,6.6 ; v1(49.2,11.8) U2.H9@49.6,12.2 ; v1(49.2,28.2) U4.H2@49.6,28.6 ; v1(49.2,33.8) U4.H9@49.6,34.2 ; U2.K2@51.2,6.6 v1(51.6,6.2) ; U2.K8@51.2,11.4 v1(51.573,11.773) ; U4.K2@51.2,28.6 v1(51.6,28.2) ; U4.K8@51.2,33.4 v1(51.573,33.773) ; U2.N1@53.6,5.8 v1(54,5.4) ; U2.N9@53.6,12.2 v1(54,12.6) ; U4.N1@53.6,27.8 v1(54,27.4) ; U4.N9@53.6,34.2 v1(54,34.6) ; U2.R1@55.2,5.8 v1(55.6,5.4) ; U2.R9@55.2,12.2 v1(55.6,12.6) ; U4.R1@55.2,27.8 v1(55.6,27.4) ; U4.R9@55.2,34.2 v1(55.6,34.6)
  L1 w0.4: C12.1@38.6,11.85 38.65,11.8 v1(39.4,11.8) ; C17.1@38.6,28.25 39.15,28.25 v1(39.4,28.5) ; v1(40,15.2) C26.1@40,15.9 ; C39.1@40,24.1 v1(40,24.8) ; C14.1@41.75,1.9 41.75,2.55 v1(42,2.8) ; C15.1@41.75,38.1 41.75,37.45 v1(42,37.2) ; v1(42.2,15.2) C24.1@42.2,15.9 ; C40.1@42.2,24.1 v1(42.2,24.8) ; C27.1@43.2,2.1 v1(43.2,2.8) ; v1(44.2,37.2) C36.1@44.2,37.9 ; v1(44.4,15.2) C25.1@44.4,15.9 ; C31.1@44.4,24.1 v1(44.4,24.8) ; C28.1@46.4,2.1 v1(46.4,2.8) ; v1(46.4,37.2) C37.1@46.4,37.9 ; v1(46.6,15.2) C23.1@46.6,15.9 ; C33.1@46.6,24.1 v1(46.6,24.8) ; C29.1@48.6,2.1 v1(48.6,2.8) ; v1(48.6,37.2) C34.1@48.6,37.9 ; C30.1@54.3,2.1 v1(54.3,2.8) ; v1(54.3,15.2) C22.1@54.3,15.9 ; C32.1@54.3,24.1 v1(54.3,24.8) ; v1(54.3,37.2) C38.1@54.3,37.9 ; C21.1@56.5,2.1 v1(56.5,2.8) ; v1(56.5,37.2) C35.1@56.5,37.9 ; v1(58.6,2.8) 58.85,2.55 C13.1@58.85,1.9 ; v1(58.6,37.2) 58.85,37.45 C16.1@58.85,38.1
  L12 w0.2: 49.15,29.05 49.175,29.025 49.175,28.225 v1(49.2,28.2) ; U13.30@63.95,17.6 63.95,16.95 v1(64,16.9)
  L12 w0.3: v1(30.9,20.4) 31.028,20.4 31.628,19.8 C170.1@31.9,19.8 ; v1(34.1,19.6) C172.1@34.95,19.6 ; v1(43.6,11.8) U3.A1@44,12.2 ; v1(43.6,33.8) U5.A1@44,34.2 ; U3.A8@44,6.6 v1(44.4,6.2) ; U5.A8@44,28.6 v1(44.4,28.2) ; U3.B2@44.8,11.4 45.225,11.825 v1@45.225,12.575 ; U5.B2@44.8,33.4 45.225,33.825 45.225,34.575 v1(45.2,34.6) ; v1(45.2,5.4) U3.C9@45.6,5.8 ; v1(45.2,27.4) U5.C9@45.6,27.8 ; U3.C1@45.6,12.2 v1(46,12.6) ; U5.C1@45.6,34.2 v1(46,34.6) ; v1(46,5.4) U3.D9@46.4,5.8 ; v1(46,11.8) U3.D2@46.4,11.4 ; v1(46,27.4) U5.D9@46.4,27.8 ; v1(46,33.8) U5.D2@46.4,33.4 ; U3.E9@47.2,5.8 v1(47.6,5.4) ; U5.E9@47.2,27.8 v1(47.6,27.4) ; U3.F1@48,12.2 v1(48.4,12.6) ; U5.F1@48,34.2 v1(48.4,34.6) ; U5.G7@48.8,29.4 49.15,29.05 ; U3.G7@48.8,7.4 v1(49.2,7) ; v1(49.2,6.2) U3.H9@49.6,5.8 ; v1(49.2,11.8) U3.H2@49.6,11.4 ; v1(49.2,28.2) U5.H9@49.6,27.8 ; v1(49.2,33.8) U5.H2@49.6,33.4 ; U3.K8@51.2,6.6 v1(51.6,6.2) ; U3.K2@51.2,11.4 v1(51.573,11.773) ; U5.K8@51.2,28.6 v1(51.6,28.2) ; U5.K2@51.2,33.4 v1(51.573,33.773) ; U3.N9@53.6,5.8 v1(54,5.4) ; U3.N1@53.6,12.2 v1(54,12.6) ; U5.N9@53.6,27.8 v1(54,27.4) ; U5.N1@53.6,34.2 v1(54,34.6) ; U3.R9@55.2,5.8 v1(55.6,5.4) ; U3.R1@55.2,12.2 v1(55.6,12.6) ; U5.R9@55.2,27.8 v1(55.6,27.4) ; U5.R1@55.2,34.2 v1(55.6,34.6)
  L12 w0.4: C158.1@31.6,16.6 31.5,16.6 v1(30.9,17.2) 31.5,17.8 C162.1@31.6,17.8 ; v1(34.1,19.6) C172.1@34.95,19.6 ; v1(40,15.2) C46.1@40,15.9 ; C60.1@40,24.1 v1(40,24.8) ; v1(42.2,15.2) C43.1@42.2,15.9 ; C51.1@42.2,24.1 v1(42.2,24.8) ; C47.1@43.2,2.1 v1(43.2,2.8) ; v1(44.2,37.2) C57.1@44.2,37.9 ; v1(44.4,15.2) C45.1@44.4,15.9 ; C53.1@44.4,24.1 v1(44.4,24.8) ; C49.1@46.4,2.1 v1(46.4,2.8) ; v1(46.4,37.2) C56.1@46.4,37.9 ; v1(46.6,15.2) C44.1@46.6,15.9 ; C52.1@46.6,24.1 v1(46.6,24.8) ; C48.1@48.6,2.1 v1(48.6,2.8) ; v1(48.6,37.2) C59.1@48.6,37.9 ; C50.1@54.3,2.1 v1(54.3,2.8) ; v1(54.3,15.2) C42.1@54.3,15.9 ; C54.1@54.3,24.1 v1(54.3,24.8) ; v1(54.3,37.2) C58.1@54.3,37.9 ; C41.1@56.5,2.1 v1(56.5,2.8) ; v1(56.5,37.2) C55.1@56.5,37.9 ; v1(61.4,8.5) R59.2@61.4,9.2
  other v1: 61.9,16.6 62.4,17 61.9,17.4 30.9,18.8 30.9,22 30.1,23.6 29.3,24.4 30.1,26 43.6,27.4 66.25,32.95 64.5,33.1
+1V375: C90.1 C91.1 C92.1 C93.1 C94.1 C95.1 C96.1 C107.1 C108.1 C109.1 C110.1 C111.1 C216.1 C217.1 C232.1 FB2.2 FB8.2 L2.2 R77.1 TP7.1 U1.H14 U1.J14 U1.K9 U1.K14 U1.L9 U1.L14 U1.M9 U1.M14 U1.N9 U1.N14 U1.P9 U1.P14 U1.R9 U1.R14 U1.T9 U1.U9 U11.30 | length 15.1
  L3 w0.4: v1(5.5,24.5) 7.1,22.9 v1(8,22.9)
  L12 w0.2: 5.9,23.1 6.05,22.95 U11.30@6.05,22.4
  L12 w0.3: 5.5,23.6 5.5,23.5 5.9,23.1
  L12 w0.4: 5.5,23.6 v1(5.5,24.5) ; v1(13.3,9.7) 13.5,9.5 R77.1@14,9.5 ; C111.1@18.15,21.2 v1(18.9,21.2) ; C92.1@22.1,20.3 22.1,20.376 22.9,21.176 v1(22.9,21.2) C93.1@23.7,20.4 v1(24.5,21.2) 24.7,21.4 C94.1@25.3,21.4 25.9,21.4 v1(26.1,21.2) 26.7,20.6 C95.1@26.9,20.6 27.5,20.6 v1(27.7,20.4)
  L12 w0.45: v1(5.2,30.2) 5.45,30.45 FB8.2@6,30.45
  other v1: 26.1,16.4 27.7,16.4 29.3,16.4 24.5,17.2 8,22.3 8.5,22.6 8.5,23.2 8,23.5 8.5,23.8 16.9,30.9 17.7,30.9
+1V375_VDDSOC_IN: C119.1 C120.1 C121.1 C122.1 C123.1 C124.1 C125.1 C126.1 C127.1 C128.1 C129.1 FB2.1 U1.H16 U1.J16 U1.K16 U1.L16 U1.M16 U1.N16 U1.P16 U1.R16 U1.T16 U1.U16 | length 7.7
  L12 w0.3: C125.1@20.7,26.5 20.7,26.3 21.2,25.8 21.2,25.246 21.9,24.546 C122.1@21.9,24.4 ; C119.1@27.7,25 27.772,25 28.7,24.072 C121.1@28.7,23.6 28.7,23.454 29.3,22.854 v1(29.3,22.8)
  L12 w0.4: C128.1@16.2,26.45 16.85,26.45 v1(17.3,26) ; C126.1@21.9,23.5 C122.1@21.9,24.4
  other v1: 27.7,22 22.9,22.8 24.5,22.8 26.1,22.8 29.3,26.8 18.1,28.4 18.9,28.4
+2V5: C153.1 C233.1 C234.1 C244.1 C245.1 C247.1 FB6.1 L4.1 R14.1 R19.1 R27.1 R34.1 R74.2 R78.2 R80.2 R147.2 TP8.1 U13.10 | length 14.9
  L12 w0.2: v1(63.1,23.1) 63.45,22.75 U13.10@63.45,22.4
  L12 w0.3: R14.1@17.3,10 R14.1@17.4,10 ; R147.2@62.7,24 62.7,23.5 v1(63.1,23.1)
  L12 w0.4: v1(15.4,24.1) 15.4,23.5 C247.1@15.5,23.4 16.121,24.021 16.979,24.021 17.358,24.4 C153.1@17.4,24.4 R80.2@18.5,24.4 ; v1(15.7,17.9) R19.1@16.3,18.5 ; v1(16.3,8.6) C244.1@16.3,9.5 16.558,9.5 17.158,10.1 R14.1@17.3,10.1 ; R78.2@26,9.9 26,9.8 v1(26.4,9.4) 26.9,9.4 R27.1@27.4,9.9 ; v1(29.7,30.2) 30,29.9 R74.2@30,29.6 ; R34.1@33.4,10.6 C245.1@34.7,10.6 34.7,10.1 v1(34.4,9.8)
  L12 w0.45: v1(6.5,26.7) 6.5,27.05 FB6.1@6.9,27.45
  other v1: 61.3,21.5 61.3,22.3 61.6,22.9
+2V5_ETH_DVDDH: C194.1 C195.1 C196.1 C197.1 C198.1 FB6.2 R75.2 R87.2 R89.2 R91.2 R94.2 R95.2 R96.2 R97.2 R98.2 R162.2 U8.16 U8.34 U8.40 | length 18.9
  L1 w0.25: v1(8.1,33) 8.35,33.25 U8.34@9.01,33.25 ; U8.40@11.25,31.51 11.25,30.95 v1(11.4,30.8) ; v1(13.7,39.2) 13.75,39.15 U8.16@13.75,38.49
  L1 w0.3: R87.2@9.6,26.7 v1(9.6,25.8) 9.6,25.5 10.4,24.7 R162.2@11,24.7 ; R89.2@11,29.7 11,30.1 11.4,30.5 v1(11.4,30.8) ; v1(13.5,24.4) 13.6,24.5 R96.2@13.6,25 ; R91.2@13.6,22.5 R97.2@13.6,23.7 v1@13.6,24.4 ; R96.2@13.6,25.1 R75.2@13.6,28.9
  L1 w0.4: v1(18.9,39) 18.9,38.7 19.1,38.5 R94.2@19.525,38.5
  L12 w0.4: C194.1@8.35,33.8 8.1,33.55 v1(8.1,33) C197.1@8.65,32.45 ; C195.1@8.7,31.5 8.7,31.1 v1(9,30.8) ; v1(11.4,30.8) 11.7,31.1 C198.1@11.7,31.4 ; v1(13.7,39.2) C196.1@14.2,38.7
  L12 w0.45: FB6.2@6.9,28.95 7.05,29.1 v1(7.7,29.1)
  other v1: 13.5,25.8
+2V5_VDDHIGH_VPH: C139.2 C140.1 C141.1 U1.H10 U1.J10 | length 6.7
  L12 w0.25: 19.328,17.5 19.478,17.65 19.922,17.65 20.072,17.5 21,17.5 C139.2@21.5,17
  L12 w0.3: C141.1@14.7,16.85 C141.1@14.75,16.8 ; C140.1@18.3,17.5 19.328,17.5 ; C139.2@21.5,17 21.625,17.125 21.625,17.397 21.903,17.675 22.175,17.675 22.5,18 v1(22.9,18)
  L12 w0.4: C141.1@14.7,16.75 14.75,16.8 v1(15.8,16.8)
+3V0_ALWAYS: C87.1 C136.1 C137.1 C142.1 C221.1 C222.1 L3.2 R48.2 R55.2 R60.2 R73.2 R103.2 R104.2 R106.2 R130.2 R138.2 R153.2 R154.2 R165.2 TP11.1 U1.G11 U1.H9 U1.J9 U6.6 U12.10 | length 16.6
  L1 w0.3: R138.2@8.6,4.3 8.9,4.3 v1(9.3,3.9)
  L1 w0.4: v1(21.3,18.8) U1.G11@21.7,18.4
  L1 w0.7: L3.2@13.75,2.5 L3.2@13.85,2.4
  L12 w0.3: R130.2@3.4,25.3 3.7,25.6 v1(4.1,25.6) ; R48.2@5.4,9 6.172,9 6.575,9.403 6.575,9.9 6.4,10.075 v1(6.4,10.6) ; R73.2@5.8,11.3 5.9,11.4 v1(6.4,11.4) 6.7,11.4 7,11.7 R103.2@7,11.9 R55.2@7,13.1 ; v1(9.3,3.9) 9.6,4.2 R106.2@9.9,4.2 ; R104.2@13.4,5.7 13.5,5.8 v1(14.1,5.8) 14.7,5.8 R165.2@14.8,5.7 ; v1(61.7,1.3) R60.2@61.7,2 ; v1(64.2,26.1) R153.2@64.8,26.1 ; v1(65.8,14.3) 66.1,14.6 R154.2@66.1,15
  L12 w0.4: C137.1@14.7,18.75 C137.1@14.8,18.85 ; C142.1@20.7,19 21.1,19 v1(21.3,18.8) ; v1(22.1,17.2) C136.1@22.9,16.4 ; U6.6@64.65,8.75 64.65,8.35 65.2,7.8 C87.1@66,7.8 v1(66.6,7.8)
  other v1: 14.1,5.2 14.7,17.6
+3V3: C1.1 C89.1 C144.1 C146.1 C147.1 C148.1 C154.1 C163.1 C164.1 C165.1 C166.1 C174.1 C177.1 C203.1 C213.1 C214.1 C215.1 FB7.1 J2.50 L1.1 R21.2 R22.2 R28.2 R29.2 R31.2 R32.2 R33.2 R38.2 R39.2 R40.2 R41.2 R42.2 R43.2 R44.2 R45.2 R46.2 R47.2 R49.2 R62.2 R63.2 R64.2 R68.2 R69.2 R76.2 R100.2 R109.1 R110.2 R111.2 R113.2 R114.2 R115.2 R123.2 R129.2 R137.2 TP6.1 U1.G14 U1.G15 U1.G16 U1.G17 U1.J7 U1.K19 U1.L19 U1.M19 U1.P7 U1.P19 U7.5 U9.1 U10.8 U11.10 | length 67
  L1 w0.2: U1.P7@27.3,15.2 27.7,14.8 v1(27.7,14)
  L1 w0.25: v2(25.7,37.3) R29.2@26.3,37.3 ; v2(25.7,38.5) R28.2@26.3,38.5 ; v2(26.2,31.7) R44.2@26.7,31.7 ; v2(26.2,32.9) R45.2@26.7,32.9 ; R62.2@26.3,2.6 v2(26.9,2.6) ; R100.2@29.7,37.3 v2(30.3,37.3) ; R39.2@29.7,38.5 v2(30.3,38.5) ; v2@32.895,2.7 R31.2@33.5,2.7 ; v2@32.908,1.408 R32.2@33.487,1.408
  L1 w0.3: v1(8.3,17.9) 8.4,18 TP6.1@8.4,19.3 ; R63.2@20.6,1.4 20.538,1.4 v1(20.038,1.9) 20.6,2.462 R64.2@20.6,2.6 ; R110.2@21.3,8.4 21.275,8.425 21.275,9.475 21.7,9.9 v1@22.8,9.9 ; v1(24.5,30.2) 24.667,30.2 25.3,30.833 R21.2@25.3,31.7 R137.2@25.3,32.9 ; v1(28.2,35.705) 28.205,35.7 R40.2@29.2,35.7 ; R115.2@32,4 31.482,4 v1(31.3,3.818) 31.3,3.2 R114.2@32.1,2.4 ; R33.2@35,4.1 35.342,3.758 v1(36.043,3.758)
  L1 w0.4: v1(20.1,31) 20.1,31.25 FB7.1@20.65,31.8 20.75,31.7 R111.2@21.8,31.7 ; v1(22.9,14.8) U1.J7@23.3,15.2 ; v1(28,9.43) 28.65,9.43 29.3,8.78 C203.1@29.3,8.2 R109.1@30.4,8.2 ; U10.8@28.05,8.305 C203.1@29.195,8.305 ; R22.2@30.1,33 R38.2@30.1,31.7 30.13,31.67 R49.2@31.575,31.67 31.575,30.925 v1(32.5,30) ; v1(36.087,5.543) 36.087,6.987 R46.2@36.1,7 R47.2@36.1,8.2
  L2 w0.25: v3(25.4,37.6) v2(25.7,37.3) ; v3(25.7,38.1) v2(25.7,38.5) ; v2(26.2,31.7) v3(26.5,32) ; v2(26.2,32.9) v3(26.5,32.6) ; v3(26.6,2.3) v2(26.9,2.6) ; v2(30.3,37.3) v3(30.6,37.6) ; v3(30.3,38.1) v2(30.3,38.5) ; v3(32.888,2.307) v2(32.888,2.707) ; v2(32.9,1.4) v3(33.2,1.7)
  L3 w0.2: v4@29.875,37.95 v4@29.9,37.925
  L3 w0.25: v3(25.4,37.6) 25.3,37.7 v4(25.3,38) 25.4,38.1 v3(25.7,38.1) ; v3(26.5,32) 26.3,32 v4(26,32.3) 26.3,32.6 v3(26.5,32.6) ; v3(26.6,2.3) 27,2.3 v4(27.1,2.4) ; v3(30.3,38.1) 30.075,38.1 29.9,37.925 v4(29.875,37.9) 29.889,37.9 30.189,37.6 v3(30.6,37.6) ; v3(32.888,2.307) 33.31,2.307 33.6,2.017 v4(33.6,1.817) 33.482,1.7 v3(33.2,1.7)
  L12 w0.2: U11.10@6.55,17.6 6.55,16.95 R123.2@7,16.5 ; R123.2@7,16.4 R123.2@7,16.5 ; R123.2@7.1,16.4 R123.2@7,16.5
  L12 w0.28: J2.50@23.25,7.67 23.25,9.35 23.4,9.5
  L12 w0.3: R68.2@1.4,10 1.7,10 v1(2.1,10.4) 2.5,10 R69.2@2.8,10 ; R129.2@6.5,4.4 6.5,4.9 v1(6.7,5.1) 7,5.1 7.5,4.6 R113.2@7.5,4.4
  L12 w0.35: v1(27.7,14) 28.3,14 C163.1@28.9,13.4
  L12 w0.4: R123.2@7.1,16.4 7.6,16.9 v1(8.3,16.9) ; v1(10.4,8.1) 10.6,8.3 R43.2@11.3,8.3 R42.2@11.3,7.1 10.9,6.7 R41.2@10.9,5.6 ; v1(15.3,27.5) 16.35,27.5 C148.1@16.8,27.95 ; C174.1@22.7,14.2 22.7,14.6 v1(22.9,14.8) ; v1(22.9,10) 23.5,10 C1.1@23.7,9.8 23.4,9.5 ; v1(24.5,25.2) 24.5,26.6 ; C144.1@26,26.5 26,25.3 v1(26.1,25.2) ; v1(28,9.43) 28.47,9.9 R76.2@28.6,9.9 29.55,9.9 C147.1@30.05,10.4
  other v1: 4.8,6.8 8,17.4 21.3,22 21.3,22.8 1.3,28.8
+3V3_ETH_AVDDH: C190.1 C199.1 C200.1 C201.1 C202.1 FB7.2 U8.1 U8.12 U8.47 | length 8.8
  L1 w0.2: FB7.2@19.05,31.8 FB7.2@19.15,31.7
  L1 w0.25: U8.47@14.75,31.51 14.75,31.101 15.051,30.8 v1(15.2,30.8) ; U8.1@15.99,32.25 16.65,32.25 v1(16.7,32.3) ; U8.12@15.99,37.75 v1@16.95,37.75
  L1 w0.4: FB7.2@19.15,31.8 19.15,31.7 19.15,31.15 v1(19.3,31)
  L12 w0.4: v1(15.2,30.8) 15,31 C202.1@15,31.4 C190.1@16,31.4 ; C200.1@16.3,33.4 16.7,33 v1(16.7,32.3) ; 16.6,38.7 16.9,38.4 v1(16.9,37.7) ; v1(19.3,31) 19.85,30.45 C199.1@19.85,30.2
+5V_LDO1: C204.1 C205.1 R116.2 R131.2 R132.2 U11.7 | length 13.7
  L12 w0.2: U11.7@7.7,18.75 8.15,18.75 8.9,18 C205.1@8.9,17.6
  L12 w0.4: R131.2@5.8,12.7 R132.2@5.8,13.9 6.1,14.2 7.3,14.2 7.6,14.5 7.6,15.25 C204.1@8.5,16.15 ; 8.975,17 10.6,17 11.1,17.5
  L12 w0.5: C204.1@8.5,16.15 8.9,16.55 C205.1@8.9,17.6 ; 11.1,17.5 11.325,17.725 12.225,17.725 R116.2@13.2,18.7
+5V_LDO2: C223.1 C224.1 R140.2 U13.7 | length 10.4
  L12 w0.2: 62.025,22.3 61.725,22 61.725,21.475 61.95,21.25 U13.7@62.3,21.25
  L12 w0.3: 62.025,22.3 62.2,22.475 62.2,22.7
  L12 w0.4: C223.1@60.35,23.7 60.55,23.5 C224.1@61.6,23.5 61.742,23.5 62.2,23.042 62.2,22.7
  L12 w0.6: R140.2@56.8,22.4 56.8,23.6 57.9,24.7 59.8,24.7 60.35,24.15 C223.1@60.35,23.7
+5V_PVCC1: C206.1 R116.1 R117.2 R118.1 U11.19 | length 16.1
  L3 w0.5: v1(2.2,19.5) 3.187,19.5 3.562,19.875 7.85,19.875 8.4,19.325 10.2,19.325 10.475,19.6 v1(12.5,19.6)
  L12 w0.2: v1(2.2,19.5) 2.45,19.25 U11.19@2.9,19.25
  L12 w0.4: C206.1@1.3,19.6 2.1,19.6 v1(2.2,19.5)
  L12 w0.5: v1(12.5,19.6) 13.1,19.6 R116.1@13.2,19.7 13.1,19.8 R117.2@13.1,21.2 13.1,22.1 R118.1@13.4,22.4
+5V_PVCC2: C225.1 R140.1 R141.2 R142.1 U13.19 | length 21.8
  L3 w0.5: v1(57.5,17.5) 59.7,17.5 60.4,18.2 60.4,19 61,19.6 64.163,19.6 64.538,19.975 65.875,19.975 67.1,21.2 v1(68.9,21.2)
  L12 w0.2: R140.1@56.85,21.05 R140.1@56.9,21.1 ; U13.19@67.1,20.75 68,20.75
  L12 w0.3: 68,20.75 68.25,20.75
  L12 w0.4: 68.25,20.75 C225.1@68.5,20.5 68.9,20.9 v1(68.9,21.2)
  L12 w0.5: R142.1@56.4,16.9 57,17.5 v1(57.5,17.5) 57.5,17.713 56,19.213 56,20.3 56.8,21.1 R140.1@56.8,21.2
+5V_USB_VBUS: C79.1 C82.1 C242.1 J1.18 U1.D10 U1.E9 | length 7.4
  L1 w0.4: U1.D10@19.3,17.6 v1(19.7,17.2) U1.E9@20.1,16.8 ; C242.1@30.6,35.7 31.045,35.7 v1(31.25,35.905)
  L12 w0.2: v1@31.25,35.805 v1(31.25,35.905)
  L12 w0.28: v1(31.25,35.905) J1.18@31.25,38.07
  L12 w0.3: C82.1@17.3,17.4 17.75,16.95 18.55,16.95 C79.1@19.1,16.4
  L12 w0.4: C79.1@19.1,16.4 19.1,16.6 v1(19.7,17.2)
+5V_VCC1: C207.1 R118.2 R127.2 R128.2 U11.3 U11.20 | length 16.5
  L3 w0.5: v1(2.2,20.3) v1@2.207,20.3 ; v1@2.213,20.3 2.7,20.3 3.8,21.4 8,21.4 8.4,21 v1(8.5,20.9)
  L12 w0.2: v1(2.2,20.3) 2.2,20.101 2.551,19.75 U11.20@2.9,19.75 ; U11.3@7.7,20.75 8.35,20.75 v1(8.5,20.9)
  L12 w0.4: v1(8.5,20.9) 9.6,22 C207.1@9.9,22 ; R128.2@11.5,24.5 11.8,24.5 12.2,24.1 R127.2@12.2,23.4
  L12 w0.5: C207.1@9.9,22 9.9,22.3 10.4,22.8 11.142,22.8 11.667,23.325 12.125,23.325 R127.2@12.2,23.4 R118.2@13.4,23.4
+5V_VCC2: C226.1 R142.2 R151.2 R152.2 U13.3 U13.20 | length 17.2
  L3 w0.5: v1(61.3,19) 62.3,18 65.487,18 v1@67.793,20.307
  L12 w0.2: 61.5,19.2 61.55,19.25 U13.3@62.3,19.25 ; U13.20@67.1,20.25 v1@67.75,20.25
  L12 w0.3: v1(61.3,19) 61.5,19.2
  L12 w0.4: R142.2@56.4,15.9 56.7,15.9 57.7,16.9 R152.2@57.9,16.9 58.2,17.2 R151.2@58.2,18.6 58.5,18.6 59,19.1 60.2,19.1 60.7,18.6 C226.1@60.7,18.5 60.8,18.5 v1(61.3,19)
  other v1: 67.8,20.3
+DDR_VREF: C3.1 C4.1 C5.1 C6.1 C7.1 C8.1 C9.1 C10.1 C11.1 C18.2 C20.1 R11.1 R12.2 U1.AC2 U2.H1 U2.M8 U3.H1 U3.M8 U4.H1 U4.M8 U5.H1 U5.M8 | length 168.6
  L1 w0.3: v1(34.1,11.6) U1.AC2@34.5,11.2 ; U2.H1@49.6,5.8 v1(50,5.4) ; U4.H1@49.6,27.8 v1(50,27.4) ; U2.M8@52.8,11.4 v1(53.2,11.8) ; U4.M8@52.8,33.4 v1(53.2,33.8)
  L1 w0.4: v1(50.9,37.2) C8.1@50.9,37.9 ; v1(51,15.2) C3.1@51,15.9 ; C9.1@51,24.1 v1(51,24.8) ; C4.1@53.1,2.1 v1(53.1,2.8)
  L5 (PWR) w0.5: 40.6,14.5 40.6,16.1
  L5 (PWR) w0.6: v1(53.1,2.8) 53.4,3.1
  L5 (PWR) w0.8: v1(34.1,11.6) 38,11.6 40.6,14.2 40.6,14.5 ; 40.6,16.1 40.6,19.8 44,23.2 56.2,23.2 62.825,29.825 62.825,30.325 63.3,30.8 ; v1(50,5.4) 51.3,5.4 52.475,4.225 ; v1(50,12.6) 51,13.6 51,13.775 ; v1(50,27.4) 50.6,26.8 50.6,26.2 ; v1(50,34.6) 50,35.85 50.2,36.05 ; v1@51,24.95 50.6,25.35 50.6,26.2 ; v1@51.1,24.9 52.1,24.9 52.725,25.525 55.825,25.525 61.3,31 61.6,31 ; v1@53.1,3 52.475,3.625 52.475,4.225 ; v1(53.2,6.2) 52.975,6.2 52.475,5.7 52.475,4.225 ; v1(53.2,11.8) 52.975,11.8 51,13.775 ; v1(53.2,28.2) 52.625,28.2 50.625,26.2 50.6,26.2 ; v1(53.2,33.8) 52.975,33.8 51.825,34.95 51.05,34.95 50.2,35.8 50.2,36.05 ; 53.4,3.1 54.4,4.1 58.1,4.1 62.3,8.3 62.3,10.7 64.925,13.325 64.925,17.125 65.7,17.9 65.7,22.275 63.475,24.5 63.475,26.625 65.225,28.375 65.225,29.8 ; 61.6,32.3 60.7,32.3 56.7,36.3 51.8,36.3 v1(50.9,37.2) 50.625,36.925 50.625,36.475 50.2,36.05 ; 63.6,29.9 63.6,28.6 62.325,27.325 62.325,21.3 63.2,20.425 63.2,16 62,14.8 58.9,14.8 57.5,16.2 52,16.2 v1(51,15.2) 51,13.775
  L12 w0.3: U3.H1@49.6,12.2 v1(50,12.6) ; U5.H1@49.6,34.2 v1(50,34.6) ; U3.M8@52.8,6.6 v1(53.2,6.2) ; U5.M8@52.8,28.6 v1(53.2,28.2)
  L12 w0.4: v1(34.1,11.6) 34.2,11.7 C7.1@34.7,11.7 ; v1(50.9,37.2) C10.1@50.9,37.9 ; v1(51,15.2) C5.1@51,15.9 ; C11.1@51,24.1 v1(51,24.8) ; C6.1@53.1,2.1 v1(53.1,2.8)
  other v1: 64.5,31.5
+HDMI_VP: C75.1 R23.2 U1.L7 | length 4.8
  L1 w0.4: v1(24.5,14.8) U1.L7@24.9,15.2
  L12 w0.3: C75.1@23.9,14.4 23.8,14.4 23.3,13.9 23.3,12.9 23.6,12.6 24.6,12.6 R23.2@24.8,12.4
  L12 w0.4: C75.1@23.9,14.4 24.3,14.8 v1(24.5,14.8)
+HDMI_VPH: C76.1 R27.2 U1.M7 | length 5.8
  L1 w0.4: U1.M7@25.7,15.2 v1(26.1,14.8)
  L12 w0.3: C76.1@26.7,13.4 26.1,12.8 26.1,11.728 26.928,10.9 R27.2@27.4,10.9
  L12 w0.35: v1(26.1,14.8) 26.1,14.026 26.7,13.426 C76.1@26.7,13.4
+LVDS_2V5: C77.1 C243.1 R34.2 U1.V7 | length 5.2
  L1 w0.2: U1.V7@30.5,15.2 30.9,14.8 v1(30.9,14)
  L12 w0.3: C77.1@31.4,13.4 31.558,13.4 32.358,12.6 C243.1@32.5,12.6
  L12 w0.4: v1(30.9,14) 31.4,13.5 C77.1@31.4,13.4 ; C243.1@32.5,12.6 32.5,12.1 33,11.6 R34.2@33.4,11.6
+NVCC_CSI: C145.1 R76.1 U1.N7 | length 5.9
  L1 w0.2: U1.N7@26.5,15.2 26.9,14.8 v1@26.9,14.05
  L12 w0.3: C145.1@27.7,13.4 27.3,13 27.3,11.9 27.686,11.514 27.914,11.514 28.528,10.9 R76.1@28.6,10.9
  L12 w0.35: v1(26.9,14) 26.989,14 27.589,13.4 27.7,13.4 C145.1@27.9,13.4
+NVCC_ENET: C155.1 C156.1 R74.1 U1.R19 | length 8.1
  L1 w0.2: v1@27.7,26.1 v1(27.7,26) 27.7,25.2 U1.R19@28.1,24.8
  L12 w0.3: C155.1@27.2,26.5 27.1,26.6 27.75,27.25 27.75,28.8 C156.1@28.35,29.4 ; C156.1@28.45,29.5 28.45,29.234 29.084,28.6 R74.1@29.876,28.6 ; R74.1@30,28.6 R74.1@29.876,28.6 ; R74.1@30.1,28.7 29.976,28.7 R74.1@29.876,28.6
  L12 w0.4: C155.1@27.2,26.6 27.2,26.5 v1(27.7,26)
+NVCC_MIPI: C149.1 R78.1 U1.K7 | length 6.1
  L1 w0.4: U1.K7@24.1,15.2 v1(24.5,15.6)
  L12 w0.3: v1(24.5,15.6) 24.5,15.472 25,14.972 25,14.8 25.1,14.7 25.625,14.175 25.625,13.9 25.8,13.725 25.8,13.175 25.625,13 25.625,12.7 25.5,12.575 25.5,11.4 R78.1@26,10.9
+NVCC_RGMII: C152.1 R80.1 U1.G18 | length 4.4
  L1 w0.4: v1(21.3,24.4) U1.G18@21.7,24
  L12 w0.3: R80.1@18.5,25.4 19.1,24.8 20.2,24.8 C152.1@20.6,25.2 ; C152.1@20.6,25.4 C152.1@20.6,25.2 ; v1(21.3,24.4) 21.3,24.5 C152.1@20.6,25.2
+PCIE_VP: C61.1 R13.2 U1.H7 | length 3.8
  L1 w0.4: v1(22.1,14.8) U1.H7@22.5,15.2
  L12 w0.3: R13.2@20.6,12.2 20.6,12.536 20.9,12.836 20.9,13.6 C61.1@21.5,14.2
  L12 w0.4: C61.1@21.5,14.2 v1(22.1,14.8)
+PCIE_VPH: C64.1 R14.2 U1.G7 | length 2.8
  L1 w0.4: v1(21.3,14.8) U1.G7@21.7,15.2
  L12 w0.3: C64.1@20.3,14.2 20.572,14.2 21.172,14.8 v1(21.3,14.8)
  L12 w0.4: R14.2@18.3,10.1 18.7,10.1 v1(19.1,9.7)
+PCIE_VPTX: C62.1 FB1.2 U1.G8 | length 2.6
  L1 w0.4: U1.G8@21.7,16 v1(22.1,15.6)
  L12 w0.4: v1(21.3,10.8) 22.1,10 FB1.2@22.15,10 ; v1(22.1,15.6) 22.3,15.4 C62.1@22.9,15.4
+SATA_VP: C68.1 R18.2 U1.G13 | length 2.7
  L1 w0.2: v1(21.3,21.2) 21.3,20.4 U1.G13@21.7,20
  L12 w0.4: R18.2@16.6,23.4 17.1,23.4 v1(17.3,23.6) ; C68.1@20.7,21.2 v1(21.3,21.2)
+SATA_VPH: C73.1 R19.2 U1.G12 | length 5
  L1 w0.4: v1(21.3,19.6) U1.G12@21.7,19.2
  L12 w0.3: R19.2@17.3,18.5 17.85,19.05 19.1,19.05 19.25,19.2 C73.1@19.7,19.2
  L12 w0.35: C73.1@19.7,19.2 20.1,19.6 v1(21.3,19.6)
+VDD_SNVS_CAP: C143.1 U1.G9 | length 1.6
  L1 w0.4: v1(21.3,16.4) U1.G9@21.7,16.8
  L12 w0.4: v1(21.3,16.4) 21.5,16.2 C143.1@21.5,15.4
+VDDPU: C130.1 C131.1 C132.1 C133.1 C134.1 C135.1 U1.H17 U1.J17 U1.K17 U1.L17 U1.M17 U1.N17 U1.P17 | length 4.5
  L12 w0.25: 22.3,26.3 22.3,26.1 22.4,26 22.4,25.7 C131.1@22.9,25.2
  L12 w0.3: 22.15,27.05 22.2,27 ; C135.1@22.85,27.5 22.95,27.5 C135.1@23,27.55 ; C131.1@22.9,25.1 22.8,25.2 C131.1@22.9,25.2
  L12 w0.4: 22.3,26.3 22.3,26.9 C132.1@21.7,27.5 22.85,27.5 C135.1@22.9,27.55
  other v1: 22.9,23.6 24.5,23.6 26.1,23.6
+VDDUSB: C80.1 C81.1 U1.F9 | length 2.8
  L1 w0.4: v1(20.5,16.4) U1.F9@20.9,16.8
  L12 w0.4: C80.1@16.6,15.35 17.05,15.35 v1(17.3,15.6) ; C81.1@19.5,15.4 v1(20.5,16.4)
+VIN: C2.1 C208.1 C209.1 C210.1 C220.1 C227.1 C228.1 C229.1 C239.1 C240.1 C241.1 J1.1 J1.2 J1.3 J1.4 J1.5 Q3.8 Q4.8 Q6.8 Q7.8 R117.1 R141.1 U11.6 U12.2 U12.3 U13.6 | length 21.9
  L12 w0.2: U11.6@7.7,19.25 C208.1@9.7,19.25 ; R141.1@56.8,19.6 R141.1@56.9,19.7 ; 61.65,20.75 U13.6@62.3,20.75
  L12 w0.28: J1.5@34.25,32.33 34.25,33.52 v1(34.55,33.82) 34.75,33.62 J1.3@34.75,32.33 ; v1(34.75,36.633) J1.4@34.75,38.07 ; J1.1@35.25,32.33 35.25,34.13 v1(35.275,34.155) ; J1.2@35.25,38.07 35.25,36.932 v1(35.55,36.633)
  L12 w0.3: 61.45,20.75 61.65,20.75
  L12 w0.4: C208.1@9.75,19.2 9.75,19.55 10.5,20.3 11.7,20.3 12.1,20.7 R117.1@12.1,21.2 ; C227.1@60.25,21.6 61.1,20.75 61.45,20.75
  L12 w0.5: R141.1@56.9,19.6 56.9,19.7 56.9,20 57.475,20.575 59.125,20.575 C227.1@60.2,21.65 ; v1(59.8,22.8) 60.25,22.35 C227.1@60.25,21.7
  other v1: 6.8,2.7 6,3.5 6.8,3.5 62.2,3.7 61.6,4.2 62.2,4.7 12.9,8.2 12.9,9 12.4,9.6 8.9,18.7 61.6,35.9 62.2,36.4 36.35,36.633 5.8,36.9 6.6,36.9 7.4,36.9 61.6,36.9
+VREF1_2V_1V5: C238.1 R135.2 U13.1 | length 3.6
  L12 w0.2: 61,17 61,17.3 ; 61.675,17.975 61.95,18.25 U13.1@62.3,18.25
  L12 w0.3: 61.4,17.7 61.675,17.975
  L12 w0.4: C238.1@60.7,17.3 61,17 61.2,16.8 R135.2@61.2,15.9 ; 61,17.3 61.4,17.7
+VREF1_2V_1V375: C219.1 R120.1 U11.1 | length 4.6
  L12 w0.2: U11.1@7.7,21.75 8.45,21.75 9.1,22.4
  L12 w0.3: 9.1,22.4 9.225,22.525
  L12 w0.4: R120.1@8.3,24.6 8.6,24.6 9.4,23.8 C219.1@9.4,23.5 9.4,22.7 9.225,22.525
+VREF1_3V3_1V5: C237.1 R134.2 U13.5 | length 9.4
  L5 (PWR) w0.6: v1(60.6,15.7) 59.9,16.4 59.9,18.6 v1(61.5,20.2)
  L12 w0.2: C237.1@60.7,20.1 60.85,20.25 v1@61.5,20.25 ; v1(61.5,20.2) 61.55,20.25 U13.5@62.3,20.25
  L12 w0.4: v1(60.6,15.7) 60.6,15.2 R134.2@61.2,14.6 ; C237.1@60.7,20 60.9,20.2 v1(61.5,20.2)
+VREF1_3V3_1V375: C218.1 R119.2 U11.5 | length 10.3
  L10 w0.5: v1(8.4,25.3) 7.4,24.3 7.4,20.9 8.4,19.9 v1(8.8,19.9)
  L12 w0.2: U11.5@7.7,19.75 8.65,19.75 v1(8.8,19.9)
  L12 w0.4: R119.2@7.75,26 7.75,25.95 v1(8.4,25.3) ; v1(8.8,19.9) 9.8,20.9 C218.1@9.9,20.9
AUD3_CLK: J2.20 R160.2 | length 4.6
  L1 w0.093: v1(30.75,9.18) 31.22,9.18 31.595,8.805 32.995,8.805 33.212,8.588 R160.2@33.212,8.172
  L12 w0.101: J2.20@30.75,7.67 v1(30.75,9.18)
AUD3_CLK_R: R160.1 U1.T5 | length 10.8
  L1 w0.093: v2(28.5,14) U1.T5@28.9,13.6 ; v2(31.713,8.172) R160.1@32.212,8.172
  L2 w0.1: v3(28.2,13.7) v2(28.5,14) ; v2(31.713,8.172) v3(32.113,8.172)
  L3 w0.08: v3(28.2,13.7) 27.7,13.2 27.7,11.7 28.225,11.175 28.225,10.745 28.8,10.17 29.228,10.17 30.063,9.335 30.063,8.792 30.955,7.9 31.84,7.9 v3(32.113,8.172)
AUD3_RXD: J2.22 U1.N3 | length 11.3
  L1 w0.093: U1.N3@26.5,12 v2(26.9,12.4)
  L2 w0.1: v2(26.9,12.4) v3(26.9,12.8)
  L3 w0.08: v3(26.9,12.8) 26.9,12.13 27.275,11.755 27.275,11.175 26.9,10.8 26.9,10.4 27.425,9.875 27.425,9.192 27.774,8.843 28.552,8.843 28.99,8.405 29.3,8.405 30.188,7.517 v1(30.188,6.242)
  L12 w0.093: v1(30.188,6.242) 30.25,6.305 J2.22@30.25,7.67
AUD3_TXC: J2.16 R72.2 | length 6
  L1 w0.093: v1(31.813,9.18) 31.868,9.125 33.43,9.125 33.875,8.68 33.875,7.243 33.618,6.985 R72.2@33.213,6.985
  L12 w0.101: J2.16@31.75,7.67 31.75,9.117 v1(31.813,9.18)
AUD3_TXC_R: R72.1 U1.N1 | length 8.3
  L1 w0.093: U1.N1@26.5,10.4 26.9,10 v2(27.6,10) ; v2(31.713,6.985) R72.1@32.213,6.985
  L2 w0.1: v2(27.6,10) v3(27.9,10.3) ; v2(31.713,6.985) v3(32.113,6.985)
  L3 w0.08: v3(27.9,10.3) 27.9,10.06 29.155,8.805 29.566,8.805 31.386,6.985 v3(32.113,6.985)
AUD3_TXD: J2.18 U1.P2 | length 9
  L1 w0.093: v2(26.913,10.8) U1.P2@27.313,11.2
  L2 w0.1: v2(26.913,10.8) v3(27.213,10.5)
  L3 w0.08: v3(27.213,10.5) 27.625,10.088 27.625,9.275 27.857,9.043 28.635,9.043 29.072,8.605 29.433,8.605 30.45,7.588 30.45,7.227 31.25,6.427 v1(31.25,6.242)
  L12 w0.093: v1(31.25,6.242) J2.18@31.25,7.67
AUD3_TXFS: J2.24 U1.N4 | length 8.6
  L1 w0.093: U1.N4@26.5,12.8 26.9,13.2 v2(27.7,13.2)
  L2 w0.1: v3(27.3,13.2) v2(27.7,13.2)
  L3 w0.08: v3(27.3,13.2) 27.3,12.013 27.5,11.813 27.5,11.117 28.2,10.417 28.2,10.143 29.163,9.18 v1(29.688,9.18)
  L12 w0.093: v1(29.688,9.18) 29.75,9.118 J2.24@29.75,7.67
BOARD_VARIANT_0: R111.1 R143.2 U1.G24 | length 5.4
  L1 w0.093: U1.G24@21.7,28.8 21.3,29.2 21.3,30.63 21.585,30.915 22.415,30.915 22.8,31.3 R111.1@22.8,31.7 R143.2@22.8,32.9
BOARD_VARIANT_1: R137.1 R144.2 U1.H25 | length 7.4
  L1 w0.093: U1.H25@22.5,29.6 23.75,30.85 23.75,32.75 23.9,32.9 R137.1@24.3,32.9 24.3,33.5 24.7,33.9 25.2,33.9 25.5,34.2 25.5,34.5 25.7,34.7 R144.2@26.1,34.7
BOOT_MODE: J1.50 Q9.1 R165.1 | length 57.8
  L10 w0.08: v6(13.25,2.4) 13.05,2.2 11.202,2.2 10.902,2.5 9.2,2.5 8.583,3.117 8.583,3.917 8.4,4.1 8.4,6.3 8,6.7 8,10 7.5,10.5 7.5,12.203 7.1,12.603 7.1,14.6 7.3,14.8 7.3,16.8 7.6,17.1 7.6,19.5 6.6,20.5 6.6,23.8 6.75,23.95 6.75,24.616 8.4,26.266 8.896,26.266 12.63,30 15.4,30 17.075,31.675 17.075,33.475 17.175,33.575 17.175,34.679 21.821,39.325 23.308,39.325 v6(23.55,39.083)
  L11 w0.1: v6(13.25,2.4) v5(13.65,2.4) ; v5(23.25,39.383) v6(23.55,39.083)
  L12 w0.093: v5(13.65,2.4) Q9.1@13.65,2.95 13.65,3.45 14,3.8 14.5,3.8 14.8,4.1 R165.1@14.8,4.7 ; J1.50@23.25,38.07 v5(23.25,39.383)
BOOT_MODE0: Q9.3 R58.2 R104.1 U1.C12 | length 39.1
  L1 w0.093: v2(18.1,19.6) U1.C12@18.5,19.2
  L2 w0.1: v2(18.1,19.6) v3(18.4,19.3)
  L3 w0.08: v4(10.3,1.4) 10.025,1.675 8.075,1.675 7.7,1.3 6.6,1.3 6.4,1.5 6.4,4.175 7.225,5 7.225,10.305 6.53,11 6.27,11 6,11.27 6,13.604 7.926,15.53 8.265,15.53 9.459,16.725 11.608,16.725 12.25,17.367 12.25,17.833 13.317,18.9 15.8,18.9 16.3,19.4 18.3,19.4 v3(18.4,19.3)
  L10 w0.08: v4(10.3,1.4) v6(10.75,1.4)
  L11 w0.1: v6(10.75,1.4) v5(11.05,1.7)
  L12 w0.093: v5(11.05,1.7) 11.65,2.3 Q9.3@11.75,2.3 11.75,4.35 R58.2@12.1,4.7 R104.1@13.4,4.7